# Altium PCB 1712_MB.PcbDoc
Units mil, origin at the board's own origin, x right, y up, seen from the top; angles counter-clockwise.
Board outline 5905.51 x 4527.56 mil, 4 copper layers (Top Layer, Layer 1, Layer 2, Bottom Layer), stack 23.756 mil thick; 26 components, 53 nets, 263 pads, 0 vias.
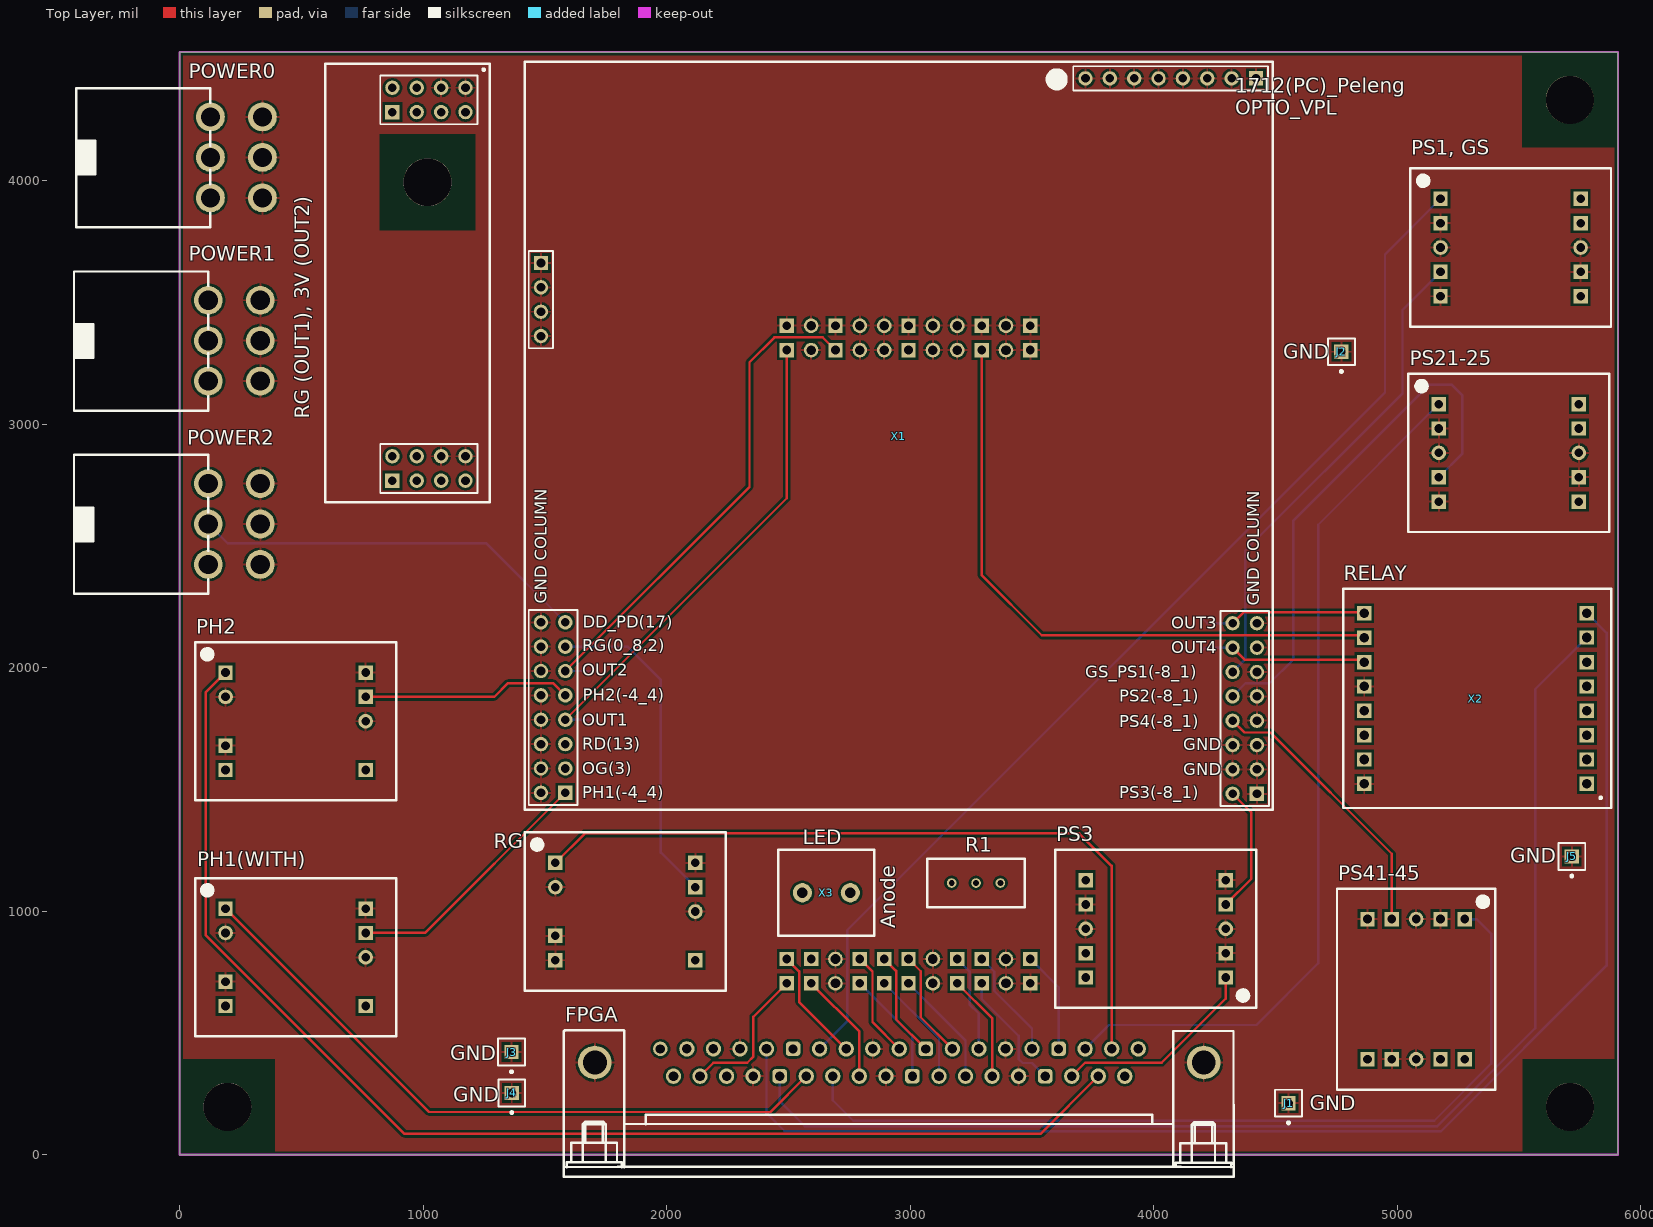
[diagram p0: Top Layer view]
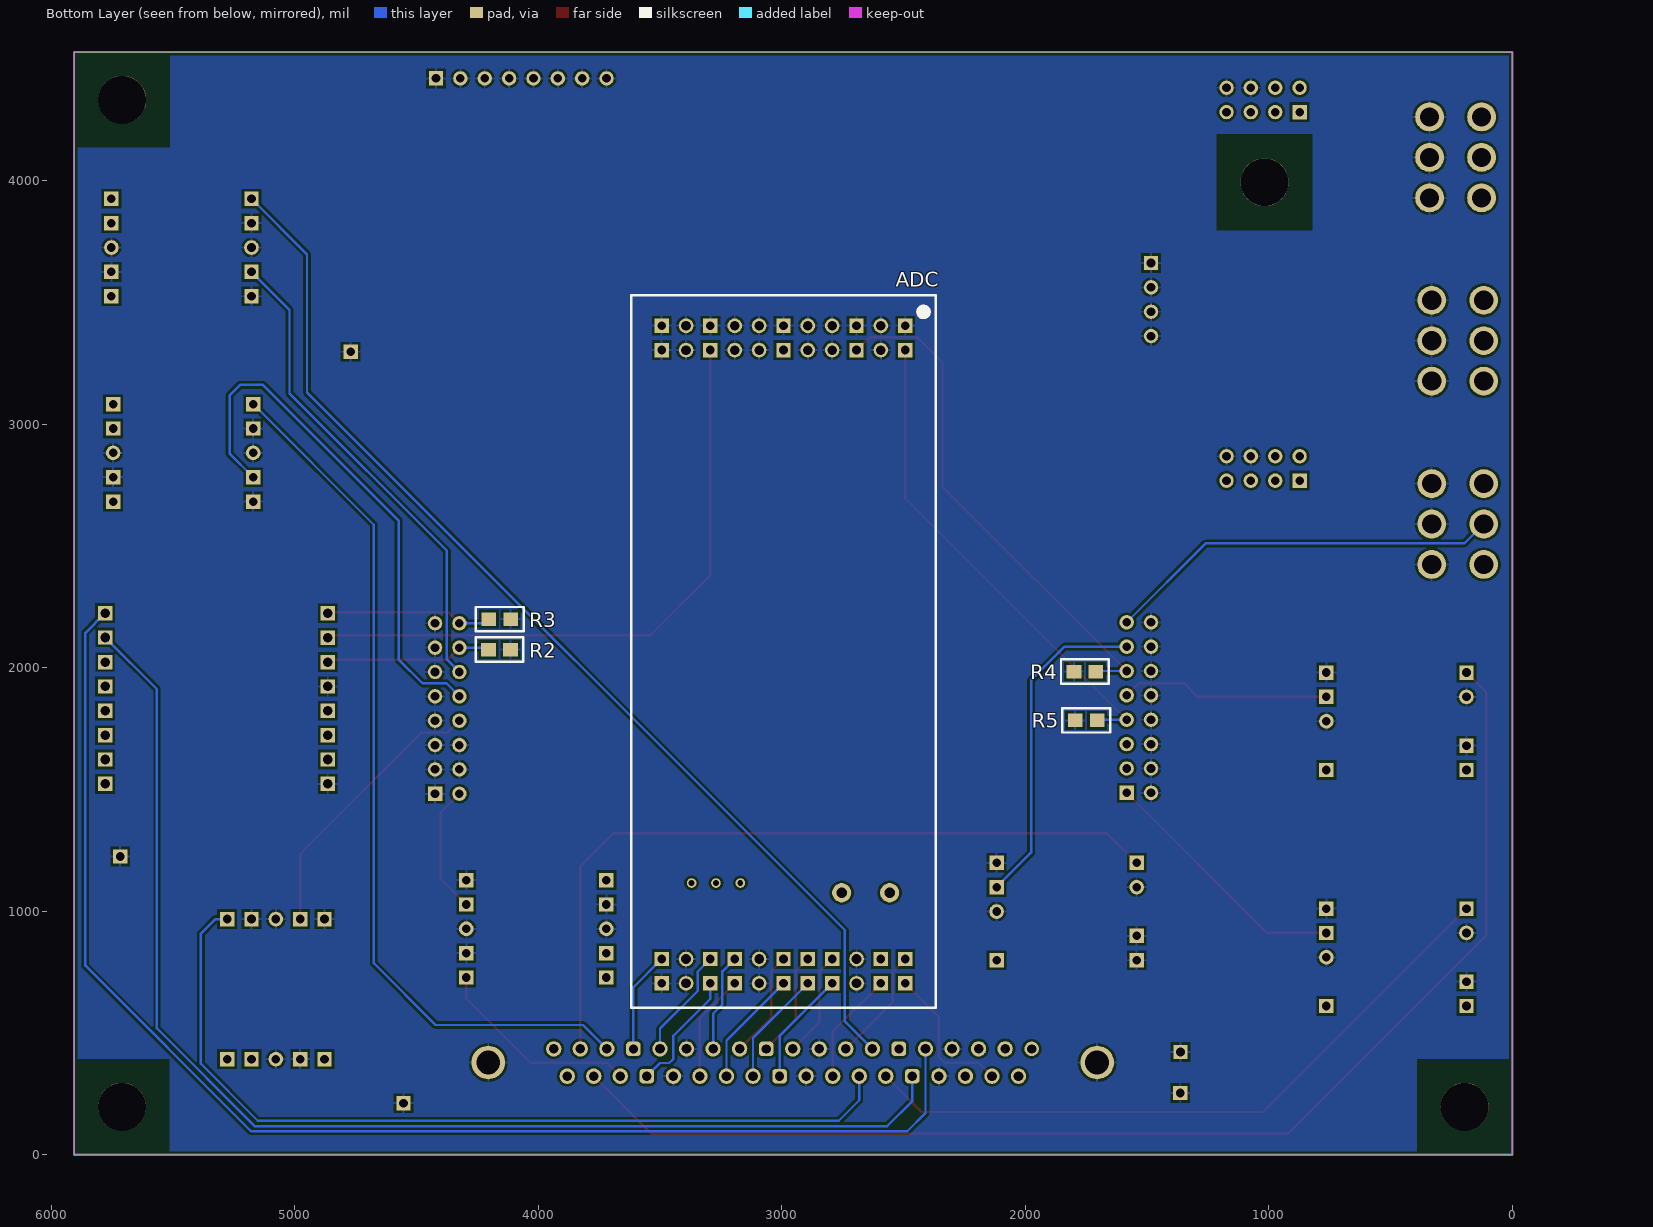
[diagram p1: Bottom Layer view, seen from below]
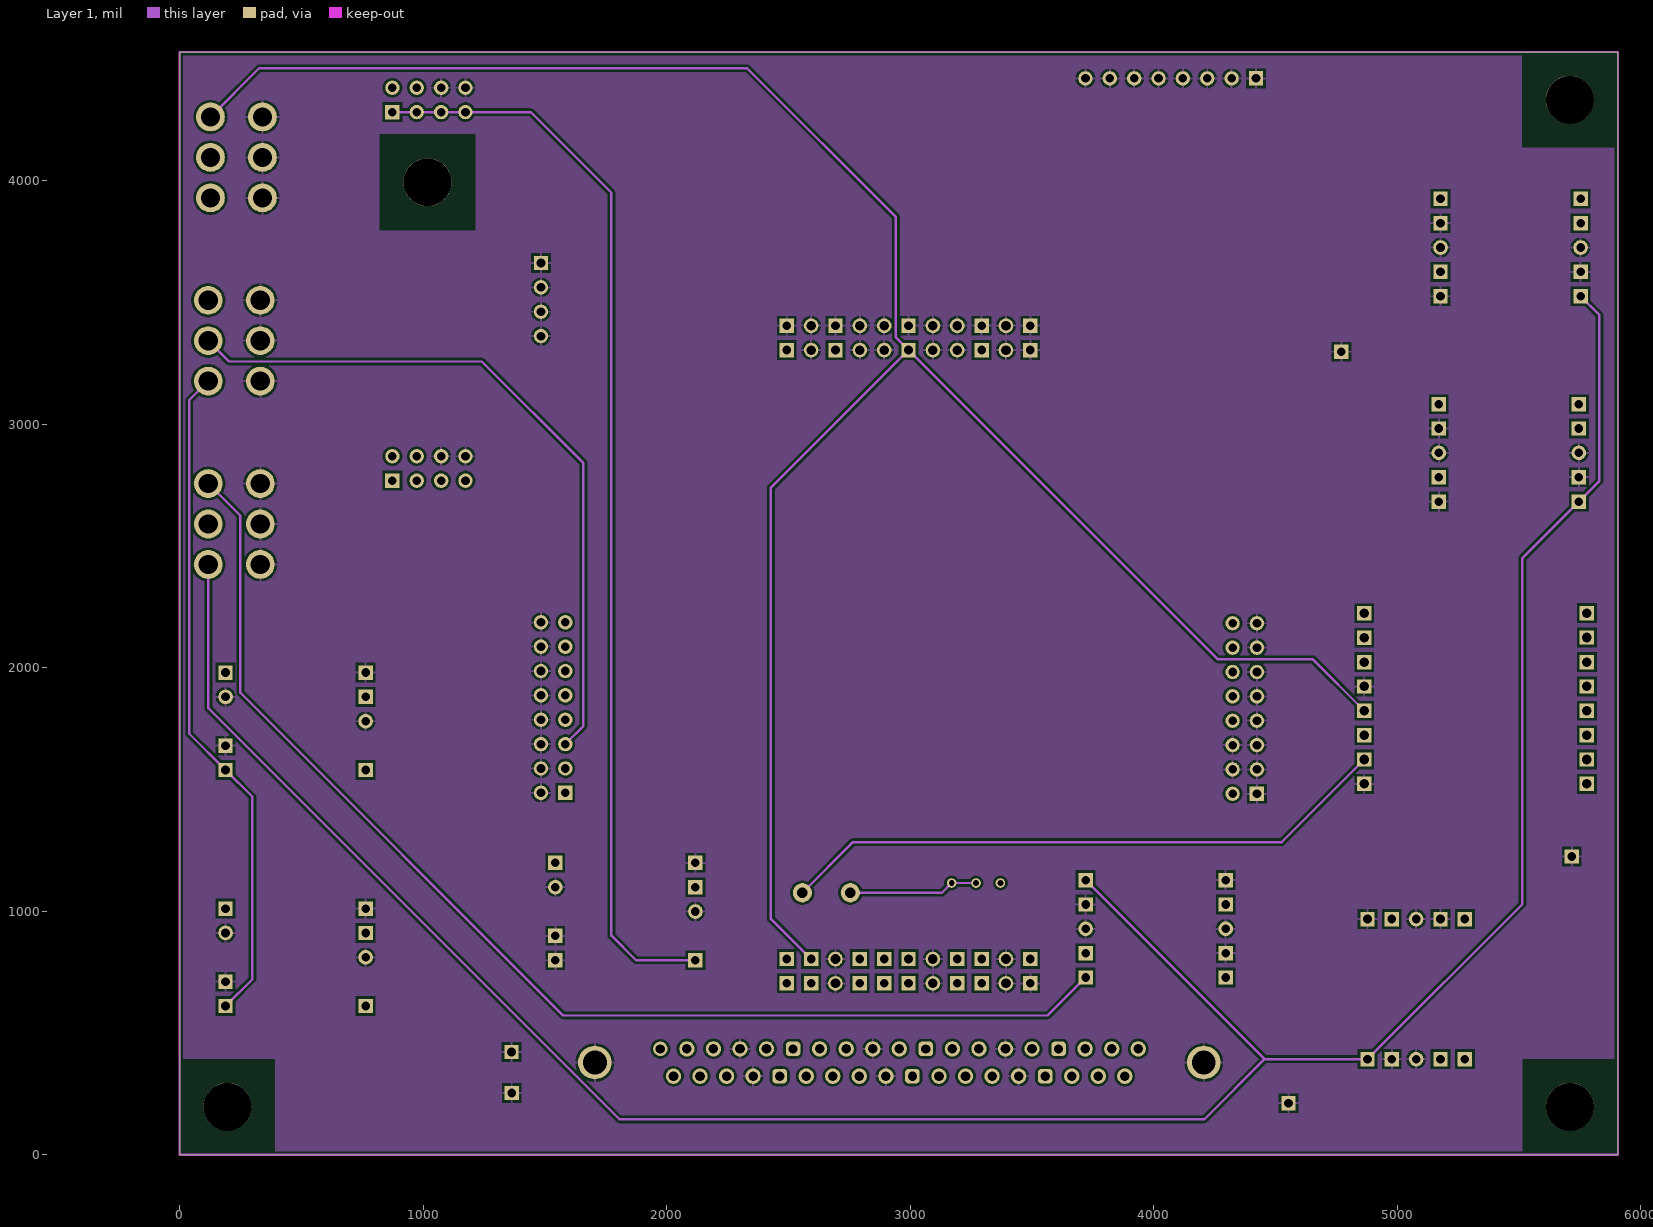
[diagram p2: Layer 1]
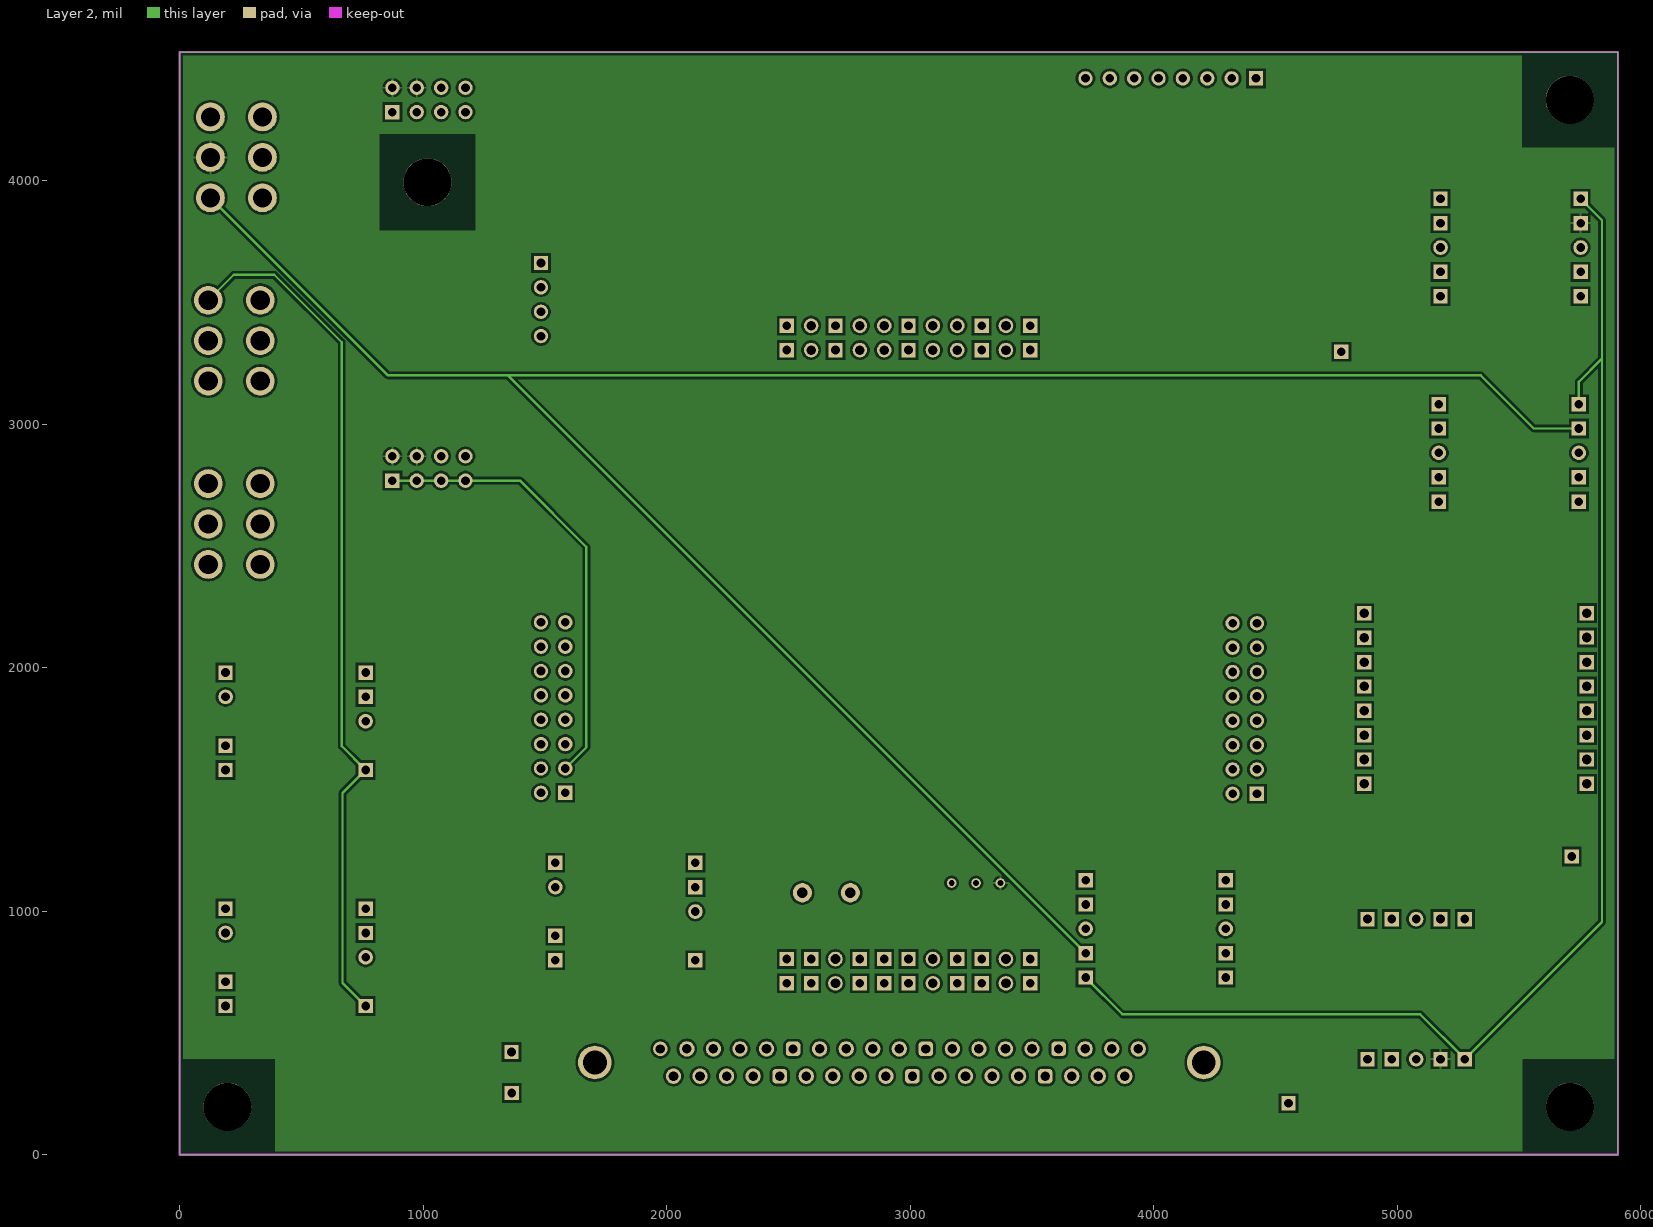
[diagram p3: Layer 2]

## Layer stack, top to bottom
Top Solder: solder mask 0.4, Solder Resist, Dk 3.5
Top Layer: signal copper 1.4
Dielectric 2: prepreg 2.8, PP-006, Dk 4.1
Layer 1: signal copper 1.378
Dielectric 1: dielectric 12.6, FR-4, Dk 4.8
Layer 2: signal copper 1.378
Dielectric 3: prepreg 2.8, PP-006, Dk 4.1
Bottom Layer: signal copper 1.4
Bottom Solder: solder mask 0.4, Solder Resist, Dk 3.5

## Board outline
0,0 5905.51,0 5905.51,4527.56 0,4527.56

## Design rules (kind name [scope] priority, off if disabled: settings)
Clearance [All] p1: gap=10 ignorepadtopadclearanceinfootprint=FALSE except(0: Arc-Hole Track-Hole SMDPad-Hole THPad-Hole Via-Hole Fill-Hole Poly-Hole Region-Hole Text-Hole)
PolygonConnect [All] p1: connectstyle=Relief reliefconductorwidth=10 reliefentries=4 polygonreliefangle="90 Angle" airgapwidth=10
RoutingVias [All] p1: holewidth=28 width=50 viastyle="Through Hole" minholewidth=28 minwidth=50 maxholewidth=28 maxwidth=50
SolderMaskExpansion [All] p1: expansion=4 istentingtop=FALSE
Width [All] p1: maxlimit=10 minlimit=10 preferedwidth=10
30 further rules are at their usual default settings.

## Components (designator, comment, footprint, x,y, rotation, side; value= is the part's Value field where it differs from the comment)
ADC "MEZON_ADC" MEZON_ADC 2493,3404 r270 bottom
FPGA "CHEAP_CON_37_FEMALE" CHEAP_CONN_FEMALE 4204.94,379 r180 top
J1 "GND" PIN1 4553,212 r180 top
J2 "GND" PIN1 4770,3297 r180 top
J3 "GND" PIN1 1363,422 r180 top
J4 "GND" PIN1 1364,254 r180 top
J5 "GND" PIN1 5716,1225 r180 top
PH1(WITH) "MEZON_H" MEZON_H 189,1011 r0 top
PH2 "MEZON_H" MEZON_H 189,1980 r0 top
POWER0 "POWER" POWER 127,4261 r90 top
POWER1 "POWER" POWER 118.11,3508.45 r90 top
POWER2 "POWER" POWER 118.11,2755.91 r90 top
"PS1, GS" "MEZON_V+15" MEZON_V 5177,3925 r0 top
PS3 "MEZON_V" MEZON_V 4295,728 r180 top
PS21-25 "MEZON_V" MEZON_V 5170,3082 r0 top
PS41-45 "MEZON_V+15" MEZON_V 5277,968 r270 top
R1 "3296" PODSTR_RES_3296 3370,1116 r180 top
R2 "1,62кОм" RES 4061,2025 r90 bottom
R3 "1,62кОм" RES 4060,2150 r90 bottom
R4 "1,62кОм" RES 1853,2033 r270 bottom
R5 "1,62кОм" RES 1848,1833 r270 bottom
RG "MEZON_H" MEZON_H 1543,1199 r0 top
"RG (OUT1), 3V (OUT2)" "MEZ_POWER" MEZON_POWER_NEW 1174,4381 r270 top
X1 "1712_Peleng_MEZ" 1712_Peleng_MEZ 1417.32,1417.32 r0 top
X2 "RELAY" RELAY_MODULE 5778,2224 r180 top
X3 "LED" KLEMMNIK_2 2754,1076 r180 top

## Footprints (in the part's own frame and the unit in brackets; to place one, negate y for a bottom-side part, rotate by r counter-clockwise, add the part's x,y. Pads: shape width x height; smd on the part's side, far side on the other; paste and mask are expansions set on the pad)
1712_Peleng_MEZ [mm]
  round 1.5 hole 0.9: 1(58.471,76.251) 2(61.011,76.251) 3(63.551,76.251) 4(66.091,76.251) 5(68.631,76.251) 6(71.171,76.251) 7(73.711,76.251) 9(73.812,19.431) 10(76.352,19.431) 11(73.812,16.891) 12(76.352,16.891) 13(73.812,14.351) 14(76.352,14.351) 15(73.812,11.811) 16(76.352,11.811) 17(73.812,9.271) 18(76.352,9.271) 19(73.812,6.731) 20(76.352,6.731) 21(73.812,4.191) 22(76.352,4.191) 23(73.812,1.651) 25(1.69,19.533) 26(4.23,19.533) 27(1.69,16.993) 28(4.23,16.993) 29(1.69,14.453) 30(4.23,14.453) 31(1.69,11.913) 32(4.23,11.913) 33(1.69,9.373) 34(4.23,9.373) 35(1.69,6.833) 36(4.23,6.833) 37(1.69,4.293) 38(4.23,4.293) 39(1.69,1.753) 41(1.69,49.38) 42(1.69,51.92) 43(1.69,54.46)
  rect 1.5x1.5 hole 0.9: 8(76.251,76.251) 24(76.352,1.651) 40(4.23,1.753) 44(1.69,57)
  silkscreen extent 0,0 78,78
CHEAP_CONN_FEMALE [mm] "CHEAP_CONN_FEMALE"
  round 1.6 hole 1: 1(6.833,-1.422) 2(9.601,-1.422) 3(12.37,-1.422) 5(17.907,-1.422) 6(20.676,-1.422) 7(23.444,-1.422) 8(26.213,-1.422) 10(31.75,-1.422) 11(34.519,-1.422) 12(37.287,-1.422) 13(40.056,-1.422) 15(45.593,-1.422) 16(48.362,-1.422) 17(51.13,-1.422) 18(53.899,-1.422) 20(8.23,1.422) 21(10.998,1.422) 22(13.767,1.422) 24(19.304,1.422) 25(22.073,1.422) 26(24.841,1.422) 27(27.61,1.422) 29(33.147,1.422) 30(35.916,1.422) 31(38.684,1.422) 32(41.453,1.422) 34(46.99,1.422) 35(49.759,1.422) 36(52.527,1.422) 37(55.296,1.422)
  rrect50% 1.524x1.524 hole 0.965: 4(15.138,-1.422) 9(28.981,-1.422) 14(42.824,-1.422) 23(16.535,1.422) 28(30.378,1.422) 33(44.221,1.422)
  round 1.524 hole 0.965: 19(56.667,-1.422)
  round 3.5 hole 2.5: 38(0,0) 39(63.5,0)
  silkscreen extent -3.11,-3.36 66.72,11.92
KLEMMNIK_2 [mm]
  round 2 hole 1.1: 1(0,0) 2(5,0)
  silkscreen extent -2.5,-4.5 7.5,4.5
MEZON_ADC [mm] "MEZON_ADC"
  rect 1.5x1.5 hole 0.9: 1(0,0) 2(2.54,0) 5(0,-5.08) 6(2.54,-5.08) 11(0,-12.7) 12(2.54,-12.7) 17(0,-20.32) 18(2.54,-20.32) 21(0,-25.4) 22(2.54,-25.4) 23(66.04,-25.4) 24(68.58,-25.4) 27(66.04,-20.32) 28(68.58,-20.32) 29(66.04,-17.78) 30(68.58,-17.78) 33(66.04,-12.7) 34(68.58,-12.7) 35(66.04,-10.16) 36(68.58,-10.16) 37(66.04,-7.62) 38(68.58,-7.62) 41(66.04,-2.54) 42(68.58,-2.54) 43(66.04,0) 44(68.58,0)
  round 1.524 hole 1: 3(0,-2.54) 4(2.54,-2.54) 7(0,-7.62) 8(2.54,-7.62) 9(0,-10.16) 10(2.54,-10.16) 13(0,-15.24) 14(2.54,-15.24) 15(0,-17.78) 16(2.54,-17.78) 19(0,-22.86) 20(2.54,-22.86) 25(66.04,-22.86) 26(68.58,-22.86) 31(66.04,-15.24) 32(68.58,-15.24) 39(66.04,-5.08) 40(68.58,-5.08)
  silkscreen extent -3.18,-28.58 71.12,3.18
MEZON_H [mm]
  rect 1.5x1.5 hole 0.9: 1(0,0) 3(0,-7.62) 4(0,-10.16) 5(14.605,-10.16) 7(14.605,-2.54) 8(14.605,0)
  round 1.524 hole 0.9: 2(0,-2.54) 6(14.605,-5.08)
  silkscreen extent -3.17,-13.34 17.78,3.17
MEZON_POWER_NEW [mm]
  round 1.5 hole 0.9: 1(0,-2.54) 1(0,0) 2(0,-5.08) 2(0,-7.62) 3(2.54,0) 3(2.54,-2.54) 3(2.54,-5.08) 4(38.43,-2.54) 4(38.43,0) 5(38.43,-5.08) 5(38.43,-7.62) 6(40.97,-2.54) 6(40.97,-5.08) 6(40.97,0)
  rect 1.5x1.5 hole 0.9: 3(2.54,-7.62) 6(40.97,-7.62)
  silkscreen extent -2.51,-14.6 43.21,2.54
MEZON_V [mm]
  rect 1.5x1.5 hole 0.9: 1(0,0) 2(0,-2.54) 4(0,-7.62) 5(0,-10.16) 6(14.605,-10.16) 7(14.605,-7.62) 9(14.605,-2.54) 10(14.605,0)
  round 1.524 hole 0.9: 3(0,-5.08) 8(14.605,-5.08)
  silkscreen extent -3.17,-13.33 17.78,3.17
PIN1 [mm] "Connector; Plug"
  rect 1.5x1.5 hole 0.9: 1(0,0)
  silkscreen extent -1.4,-1.4 1.4,2.17
PODSTR_RES_3296 [mm]
  round 1 hole 0.6: 1(0,0) 2(2.54,0) 3(5.08,0)
  silkscreen extent -2.54,-2.54 7.62,2.54
POWER [mm] "POWER"
  round 3 hole 2: 1(0,0) 2(-4.218,0) 3(-8.435,0) 4(-8.435,-5.422) 5(-4.218,-5.422) 6(0,-5.422)
  silkscreen extent -11.5,0 3,14
RELAY_MODULE [mm]
  rect 1.5x1.5 hole 1: 1(0,17.805) 2(0,15.265) 3(0,12.725) 4(0,10.185) 5(0,7.645) 6(0,5.105) 7(0,2.54) 8(0,0) 9(23.216,0.025) 10(23.216,2.565) 11(23.216,5.105) 12(23.216,7.645) 13(23.216,10.185) 14(23.216,12.725) 15(23.216,15.265) 16(23.216,17.805)
  silkscreen extent -2.54,-2.54 25.4,20.32
RES [mil] "FROM_MAX"
  rect 55.98x60 smd: 1(49,52.71) 2(49,142.71)
  silkscreen extent -1,0 99,196, body extent 17,19 81,177, height 100

## Part data
J1 J2 J3 J4 J5: library part Socket, "Socket", LatestRevisionDate=17-Jul-2002, LatestRevisionNote="Re-released for DXP Platform.", Publisher="Altium Limited"
"PS1, GS" PS41-45: library part MEZON_V_+15
R1: library part PODSTR_RES_NEW
R2 R3 R4 R5: library part RES
"RG (OUT1), 3V (OUT2)": library part MEZON_POWER_NEW
X2: library part MEZON_RELAY
X3: library part KLEMMNIK_2

## Free pads (board coordinates)
  round 196.85 hole 196.85 unplated: H(196.85,196.85) H(1018,3993) H(5708,4331) H(5708.66,196.85)

## Nets (pads, with @x,y where several pads share a name; then routed paths per layer and width w, separated by ;. In a path a pad name is that pad's centre, name@x,y a point inside that pad or via, vN(x,y) a via of type N, cw(c..) or ccw(c..) an arc to the next point about the centre after c; other vN are vias at no path point)
1V: "PS1, GS.10" POWER2.1 PS3.10 PS21-25.10 PS41-45.10 | length 10720.8
  Layer 1 w10: POWER2.1 250,2624.02 250,1897 1575,572 3564,572 PS3.10
  Layer 2 w10: PS3.10 3871,577 5093,577 PS41-45.10 5840,956 5840,3269 ; PS21-25.10 5745,3174 5840,3269 ; 5752,3925 5840,3837 5840,3269
3V: "RG (OUT1), 3V (OUT2).6" X1.38 | length 1854
  Layer 2 w10: 874,2768 1074,2768 1398,2768 1670,2496 1670,1672.46 X1.38
4V: PH1(WITH).5 PH2.5 POWER1.1 | length 3550.2
  Layer 2 w10: POWER1.1 222.66,3613 389,3613 666,3336 666,1678 PH2.5 669,1485 669,706 764,611
-15V: POWER0.3 PS3.9 PS21-25.9 | length 9364.7
  Layer 2 w10: POWER0.3 855.91,3200 1348,3200 ; PS3.9 1348,3200 ; PS21-25.9 5560,2982 5342,3200 1348,3200
ADCCLK: ADC.27 FPGA.5 | length 454.7
  Bottom Layer w10: ADC.27 3345,752 3345,673 3499.94,518.06 FPGA.5
CDSCLK1: ADC.23 FPGA.4 | length 417
  Bottom Layer w10: ADC.23 3608.94,688.06 FPGA.4
CDSCLK2: ADC.28 FPGA.23 | length 511.3
  Bottom Layer w10: ADC.28 3293,641 3445,489 3445,394 3462,377 3499.94,377 FPGA.23
D0: ADC.30 FPGA.25 | length 440.2
  Top Layer w10: ADC.30 3335.94,561.06 FPGA.25
D1: ADC.29 FPGA.7 | length 405.8
  Bottom Layer w10: ADC.29 3244,753 3244,617 3281.94,579.06 FPGA.7
D2: ADC.34 FPGA.26 | length 477.9
  Bottom Layer w10: ADC.34 3226.94,470.06 FPGA.26
D3: ADC.33 FPGA.8 | length 443.5
  Top Layer w10: ADC.33 3043,754 3043,564.94 FPGA.8
D4: ADC.36 FPGA.27 | length 474.2
  Bottom Layer w10: ADC.36 3117.94,479.06 FPGA.27
D5: ADC.35 FPGA.9 | length 439.8
  Top Layer w10: ADC.35 2942,755 2942,556.94 FPGA.9
D6: ADC.38 FPGA.28 | length 470.4
  Bottom Layer w10: ADC.38 3008.94,488.06 FPGA.28
D7: ADC.37 FPGA.10 | length 436.1
  Top Layer w10: ADC.37 2845,752 2845,544.94 FPGA.10
GND: "PS1, GS.2" "PS1, GS.3" "PS1, GS.5" "PS1, GS.7" "PS1, GS.8" "RG (OUT1), 3V (OUT2).1" "RG (OUT1), 3V (OUT2).4" ADC.1 ADC.3 ADC.4 ADC.5 ADC.7 ADC.8 ADC.9 ADC.10 ADC.11 ADC.13 ADC.14 ADC.15 ADC.16 ADC.17 ADC.19 ADC.20 ADC.21 ADC.22 ADC.24 ADC.25 ADC.26 ADC.31 ADC.32 ADC.39 ADC.40 FPGA.6 FPGA.11 FPGA.16 FPGA.24 FPGA.29 FPGA.34 FPGA.38 FPGA.39 J1.1 J2.1 J3.1 J4.1 J5.1 PH1(WITH).2 PH1(WITH).3 PH1(WITH).6 PH1(WITH).8 PH2.2 PH2.3 PH2.6 PH2.8 POWER0.4 POWER0.5 POWER0.6 POWER1.4 POWER1.5 POWER1.6 POWER2.4 POWER2.5 POWER2.6 PS3.2 PS3.3 PS3.5 PS3.7 PS3.8 PS21-25.2 PS21-25.3 PS21-25.5 PS21-25.7 PS21-25.8 PS41-45.2 PS41-45.3 PS41-45.5 PS41-45.7 PS41-45.8 R2.1 R3.1 R4.1 R5.1 RG.2 RG.3 RG.4 RG.6 RG.8 X1.1 X1.2 X1.3 X1.4 X1.5 X1.6 X1.7 X1.8 X1.10 X1.12 X1.14 X1.16 X1.18 X1.19 X1.20 X1.21 X1.22 X1.24 X1.25 X1.27 X1.29 X1.31 X1.33 X1.35 X1.37 X1.39 X1.41 X1.42 X1.43 X1.44 X2.12 X2.16
GS_PS1: "PS1, GS.4" X1.13 | length 1996.3
  Bottom Layer w10: X1.13 4375,2034 4375,2480 5021,3126 5021,3469 5177,3625
LED_CAT: X2.15 X3.2 | length 2533.4
  Layer 1 w10: X3.2 2765.15,1284 4525,1284 X2.15
NetR1_2: R1.2 R1.3 X3.1 | length 532.6
  Layer 1 w10: X3.1 3130,1076 R1.3 R1.2
OUT1: ADC.2 R5.2 X1.34 | length 2016.7
  Top Layer w10: X1.34 2493,2695.46 ADC.2
  Bottom Layer w10: X1.34 1702.97,1786.32 R5.2
OUT2: ADC.6 R4.2 X1.30 | length 2125.1
  Top Layer w10: X1.30 2340,2742.46 2340,3254 2442,3356 2641,3356 ADC.6
  Bottom Layer w10: X1.30 1707.97,1986.32 R4.2
OUT3: R3.2 X1.9 X2.9 | length 688.2
  Top Layer w10: X1.9 4367.85,2226.85 4860.15,2226.85 X2.9
  Bottom Layer w10: R3.2 4219.38,2182.32 X1.9
OUT4: R2.2 X1.11 X2.11 | length 688.3
  Top Layer w10: X1.11 4372.65,2033 4854,2033 X2.11
  Bottom Layer w10: R2.2 4212.03,2082.32 X1.11
P0.0: FPGA.15 X2.8 | length 5505.3
  Bottom Layer w10: FPGA.15 2409.94,172.06 2485,97 5179,97 5859,777 5859,2143 X2.8
P0.1: FPGA.33 X2.7 | length 5105
  Bottom Layer w10: FPGA.33 2463.94,221.06 2567,118 5164,118 5566,520 5566,1912 X2.7
P0.2: FPGA.14
P0.3: FPGA.32 PH1(WITH).1 | length 2790.7
  Top Layer w10: 189,1011 1024,176 2425.94,176 FPGA.32
P0.4: "PS1, GS.1" FPGA.13 | length 4545.9
  Bottom Layer w10: FPGA.13 2741,548.06 2741,922 4949,3130 4949,3697 5177,3925
P0.5: FPGA.31 PS41-45.1 | length 3600.6
  Bottom Layer w10: FPGA.31 2681.94,224.06 2766,140 5151,140 5385,374 5385,908 5325,968 PS41-45.1
P2.3: FPGA.22 PS3.1 | length 850.8
  Top Layer w10: FPGA.22 3717.94,378 4032,378 4295,641 PS3.1
P2.4: FPGA.3 PS21-25.1 | length 3602.9
  Bottom Layer w10: FPGA.3 3815.94,533 4421,533 4675,787 4675,2587 PS21-25.1
P2.5: FPGA.21 PH2.1 | length 5212.5
  Top Layer w10: PH2.1 107,1898 107,903 924,86 3534.94,86 FPGA.21
P2.6: FPGA.2 RG.1 | length 3140.6
  Top Layer w10: RG.1 1664,1320 3693,1320 3826.94,1186.06 FPGA.2
P2.7: FPGA.20
PFI2: FPGA.17
PFI3: FPGA.35
PH1: PH1(WITH).7 X1.40 | length 1058.2
  Top Layer w10: 764,911 1008.54,911 X1.40
PH2: PH2.7 X1.32 | length 864.5
  Top Layer w10: PH2.7 1292,1880 1349,1937 1533.18,1937 X1.32
POWER_ADC: ADC.12 ADC.41 POWER0.1 X2.13 | length 9004.3
  Layer 1 w10: POWER0.1 327,4461 2330,4461 2941,3850 2941,3356 ADC.12 ; ADC.41 2428,969 2428,2739 ADC.12 ; X2.13 4653,2034 4263,2034 ADC.12
POWER_PH_LOW: PH1(WITH).4 PH2.4 POWER1.3 | length 2750.6
  Layer 1 w10: POWER1.3 40,3098.26 40,1729 PH2.4 299,1470 299,721 189,611
POWER_PS_LOW: "PS1, GS.6" POWER2.3 PS3.6 PS21-25.6 PS41-45.6 | length 10747.9
  Layer 1 w10: POWER2.3 118.11,1833.89 1806,146 4208,146 4455,393 ; PS3.6 4455,393 ; 5752,3525 5829,3448 5829,2766 PS21-25.6 5513,2450 5513,1029 PS41-45.6 4455,393
POWER_RD: POWER1.2 X1.36 | length 2932.4
  Layer 1 w10: POWER1.2 203.52,3257 1241,3257 1658,2840 1658,1760.46 X1.36
POWER_RG: "RG (OUT1), 3V (OUT2).3" RG.5 | length 4472.9
  Layer 1 w10: 874,4281 974,4281 1074,4281 1174,4281 1442,4281 1773,3950 1773,900 1874,799 RG.5
POWER_VDD_PD: POWER2.2 X1.26 | length 1632.9
  Bottom Layer w10: POWER2.2 197.97,2510 1260.18,2510 X1.26
PS3: PS3.4 X1.23 | length 529.6
  Top Layer w10: PS3.4 4400,1133 4400,1405.65 X1.23
PS21-25: PS21-25.4 X1.15 | length 2201.2
  Bottom Layer w10: X1.15 4377,1936 4475,1936 4573,2034 4573,2604 5130,3161 5224,3161 5267,3118 5267,2879 PS21-25.4
PS41-45: PS41-45.4 X1.17 | length 1148
  Top Layer w10: X1.17 4371.65,1734 4479,1734 4977,1236 PS41-45.4
RG: RG.7 X1.28 | length 1357.8
  Bottom Layer w10: X1.28 1838.68,2086.32 1976,1949 1976,1241 RG.7
SCLK: ADC.43 FPGA.12 | length 470
  Top Layer w10: ADC.43 2544,753 2544,627.94 FPGA.12
SDATA: ADC.44 FPGA.36 | length 609.9
  Top Layer w10: FPGA.36 2191.94,378 2331,378 2356,403 2356,567 ADC.44
SLOAD: ADC.42 FPGA.30 | length 463
  Top Layer w10: ADC.42 2790.94,506.06 FPGA.30
"STAB (+15)": "PS1, GS.9" "RG (OUT1), 3V (OUT2).2" "RG (OUT1), 3V (OUT2).5" POWER0.2 PS41-45.9 R1.1
VINR: ADC.18 X2.10 | length 2601.5
  Top Layer w10: ADC.18 3293,2380 3540,2133 4854,2133 X2.10
pads on no net: FPGA.1 FPGA.18 FPGA.19 FPGA.37 X2.1 X2.2 X2.3 X2.4 X2.5 X2.6 X2.14

## Polygon pours and split planes (outlines as drawn)
GND on Top Layer "Top Overlay-No Net" (solid, remove dead copper, pour order 0): 0,4527.56 0,0 5905.51,0 5904.85,0.66 5904.85,4527.85
GND on Layer 1 "Top Overlay-No Net" (solid, remove dead copper, pour order 1): 0,4527.56 0,0 5905.51,0 5905.51,4527.19 5904.85,4527.85
"STAB (+15)" on Layer 2 "Top Overlay-No Net" (solid, remove dead copper, pour order 2): 0,4527.56 0,0 5905.51,0 5904.85,0.66 5904.85,4527.85
GND on Bottom Layer "Top Overlay-No Net" (solid, remove dead copper, pour order 3): 0,4527.56 0,0 5905.51,0 5905.51,4527.19 5904.85,4527.85

## Keep-outs
Keep-Out Layer:
  the board outline again, w10

## Other copper
Multi-Layer:
  pour cut-out: 5905.51,393.7 5905.51,0 5511.81,0 5511.81,393.7
  pour cut-out: 5904.85,4527.85 5904.85,4134.15 5511.15,4134.15 5511.15,4527.85
  pour cut-out: 1214.85,4189.85 1214.85,3796.15 821.15,3796.15 821.15,4189.85
  pour cut-out: 393.7,393.7 393.7,0 0,0 0,393.7

## Silkscreen, mask and mechanical layers (free items; w line width, h text height)
Top Overlay:
  text "1712(PC)_Peleng / OPTO_VPL" at 4334.21,4270.53 h60

## Text inside footprints (layer, text, board x,y; h text height)
X1: Top Overlay "GND COLUMN" at 4432.15,2254.09 h49.21 r90; Top Overlay "GND COLUMN" at 1507.2,2262.94 h49.21 r90; Top Overlay "DD_PD(17)" at 1654.54,2164.33 h49.21; Top Overlay "RG(0_8,2)" at 1653.54,2066.52 h49.21; Top Overlay "OUT2" at 1653.54,1966.13 h49.21; Top Overlay "PH2(-4_4)" at 1655.54,1864.33 h49.21; Top Overlay "OUT1" at 1653.54,1761.13 h49.21; Top Overlay "RD(13)" at 1653.54,1663.13 h49.21; Top Overlay "OG(3)" at 1653.54,1562.13 h49.21; Top Overlay "PH1(-4_4)" at 1652.54,1463.33 h49.21; Top Overlay "OUT3" at 4071.54,2159.13 h49.21; Top Overlay "OUT4" at 4071.54,2059.16 h49.21; Top Overlay "GS_PS1(-8_1)" at 3718.54,1958.33 h49.21; Top Overlay "PS2(-8_1)" at 3858.35,1860.33 h49.21; Top Overlay "PS4(-8_1)" at 3858.35,1756.33 h49.21; Top Overlay "PS3(-8_1)" at 3858.54,1463.33 h49.21; Top Overlay "GND" at 4120.54,1558.13 h49.21; Top Overlay "GND" at 4120.73,1661.13 h49.21
X3: Top Overlay "Anode" at 2939,931 h60 r90